# Allegro board F28_4L.brd
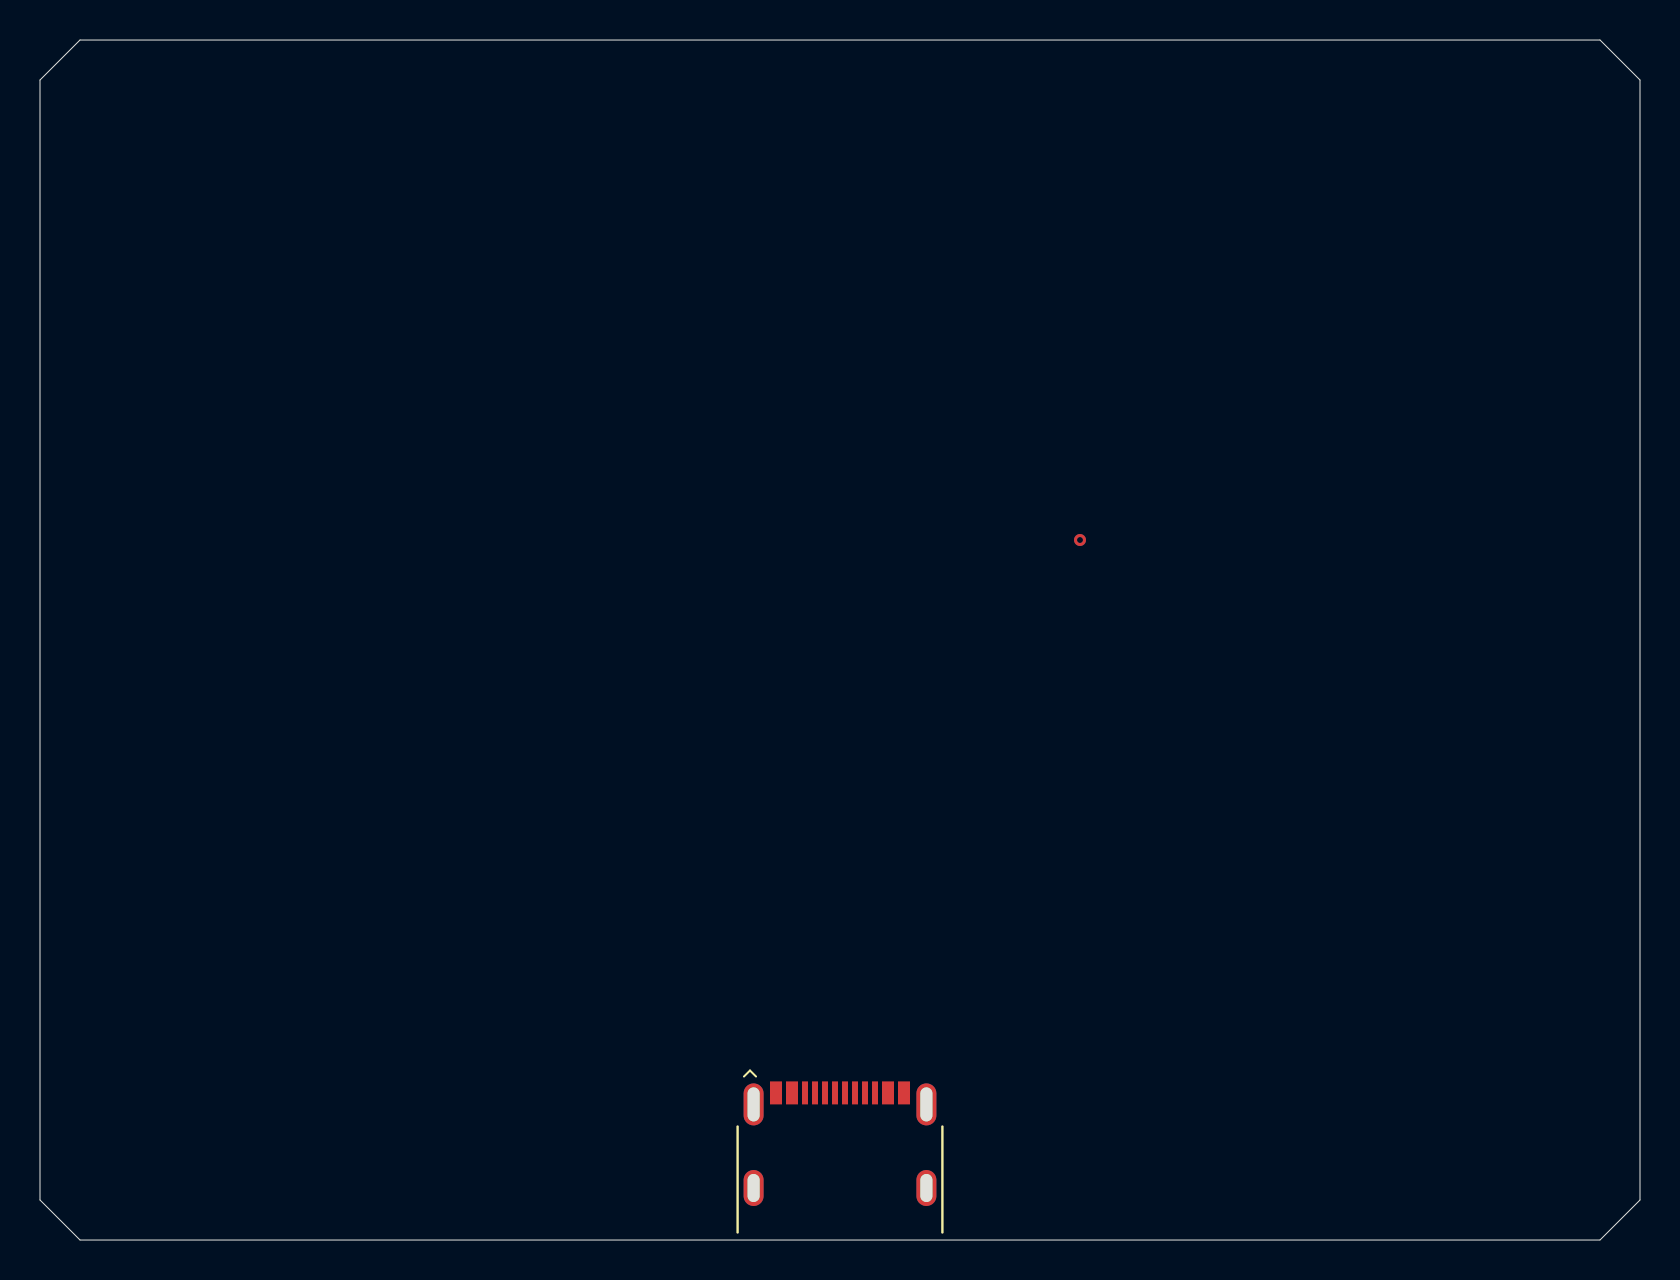
[diagram p0: board, top side]
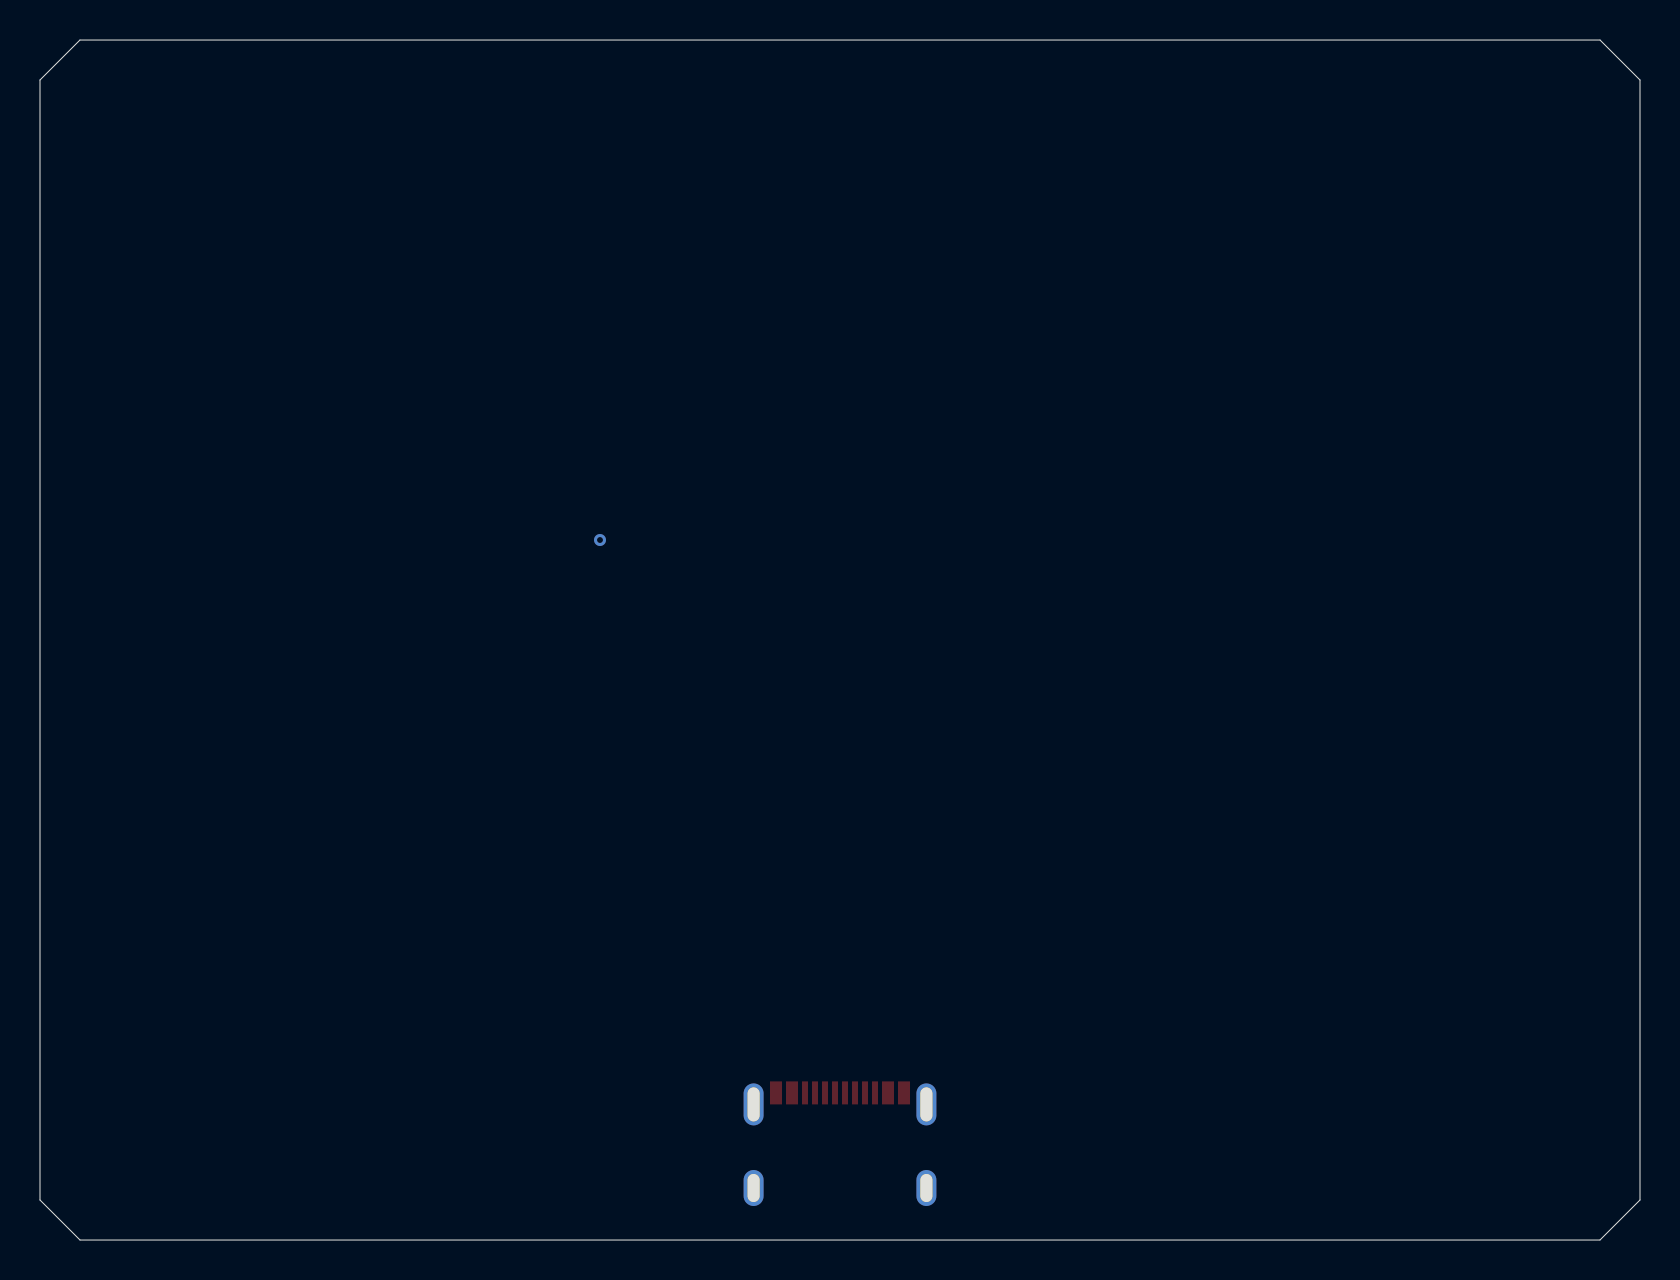
[diagram p1: board, bottom side, seen from below]

Outline 80 x 60 mm; copper layers: TOP, L2, L3, BOTTOM. Coordinates in mm from the lower left corner of the outline.
Outline path: 0,58 0,2 2,0 78,0 80,2 80,58 78,60 2,60 0,58

## Design rules (mm)
constraint set DEFAULT: min track width 0.127

## Placement (name value [footprint] x y rotation side)
J2  USB-C USB2 DEVICE  [L10_GCT_USB4105_GF_A_12LAND]  40 3.67 0 top
NOREF  -  [unnamed]  5 55 0 top
NOREF#2  -  [unnamed]  75 5 0 top
NOREF#3  -  [unnamed]  5 5 0 top
NOREF#4  -  [unnamed]  75 55 0 top

## Library data of the parts
J2 = DE_USB4105_GF_A

## Footprints (pads in the part's own frame, mm; a bottom-side part is the same pattern mirrored in y, then rotated)
L10_GCT_USB4105_GF_A_12LAND
  round 0 hole 0.65 unplated: (-2.89,2.605) (2.89,2.605)
  rect 0.6x1.15 smd: A1_B12(-3.2,3.68) A4_B9(-2.4,3.68) B1_A12(3.2,3.68) B4_A9(2.4,3.68)
  rect 0.3x1.15 smd: A5(-1.25,3.68) A6(-0.25,3.68) A7(0.25,3.68) A8(1.25,3.68) B5(1.75,3.68) B6(0.75,3.68) B7(-0.75,3.68) B8(-1.75,3.68)
  oval 1x2.1 hole 0.6x1.7: SH1(-4.32,3.105) SH2(4.32,3.105)
  oval 1x1.8 hole 0.6x1.4: SH3(-4.32,-1.075) SH4(4.32,-1.075)
unnamed
  round 0 hole 2 unplated: (0,0)

## Nets
GND: J2.A1_B12 J2.B1_A12 J2.SH1 J2.SH2 J2.SH3 J2.SH4
USB_CC1: J2.A5
USB_CC2: J2.B5
USB_DM: J2.A7 J2.B7
USB_DP: J2.A6 J2.B6
USB_VBUS: J2.A4_B9 J2.B4_A9(VBUS2)

Pads without a net: J2 A8 B8

## Via types
v1: diameter 0.6, hole 0.3, TOP to BOTTOM, 1 via

## Routing (per net, layer and track width the routed paths; a pad name or vN(x,y) marks a point on that pad's centre or on a via; arc(x,y) is an arc through that point)
GND:
  vias: v1(52,35)

## Text on the board
User.5: TOP LOW PROFILE Z<=2; x10..30 y42..52 | DATUM A=(0,0); TOP +Z; UNITS mm | 80 x 60; C2 x 4; NPTH D2 @ (5,5),(75,5),(75,55),(5,55) | J2 EDGE y=0; OPENING -Y; INSERTION +Y; H<=3.46 | 80.000
